# EAGLE board Keyboard_C64_HotSwap_noFrame (EAGLE 9.6.0), part 1 of 2
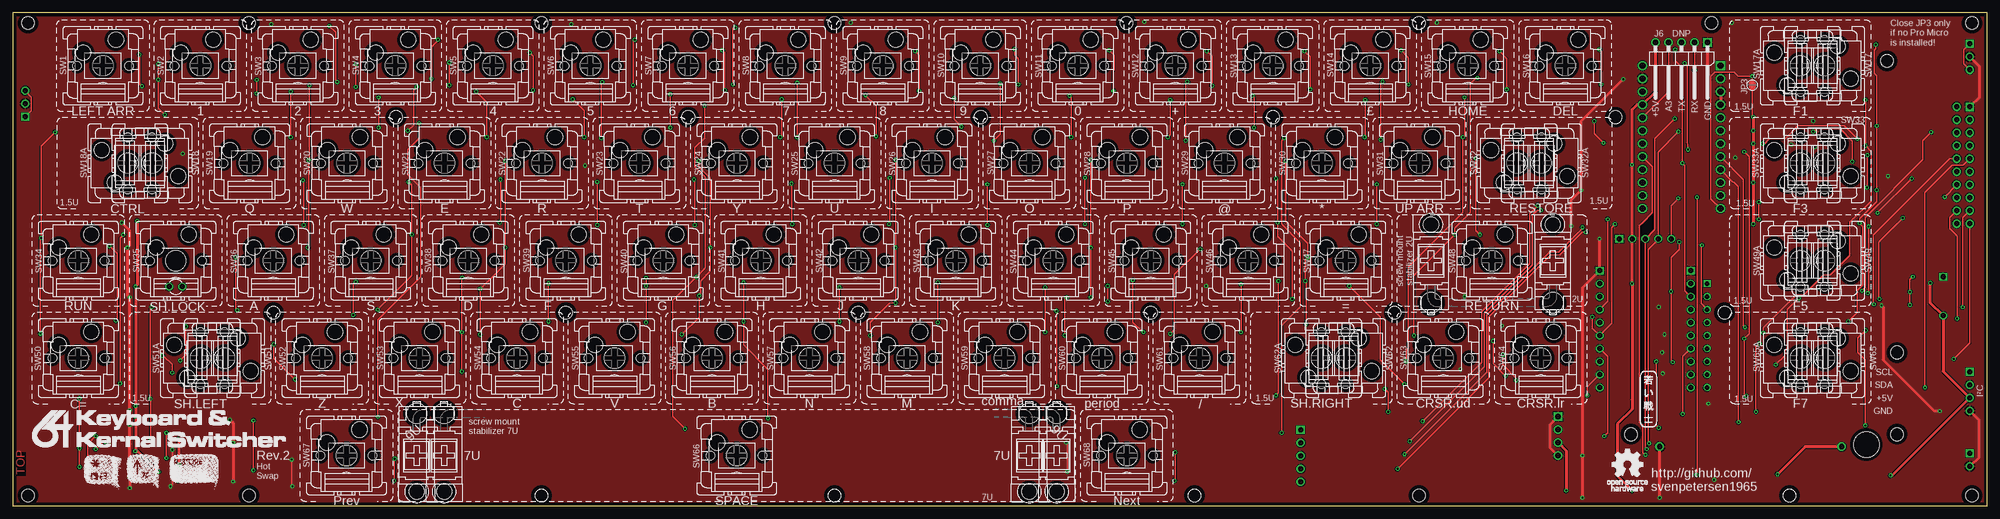
[diagram p0: board, top side]
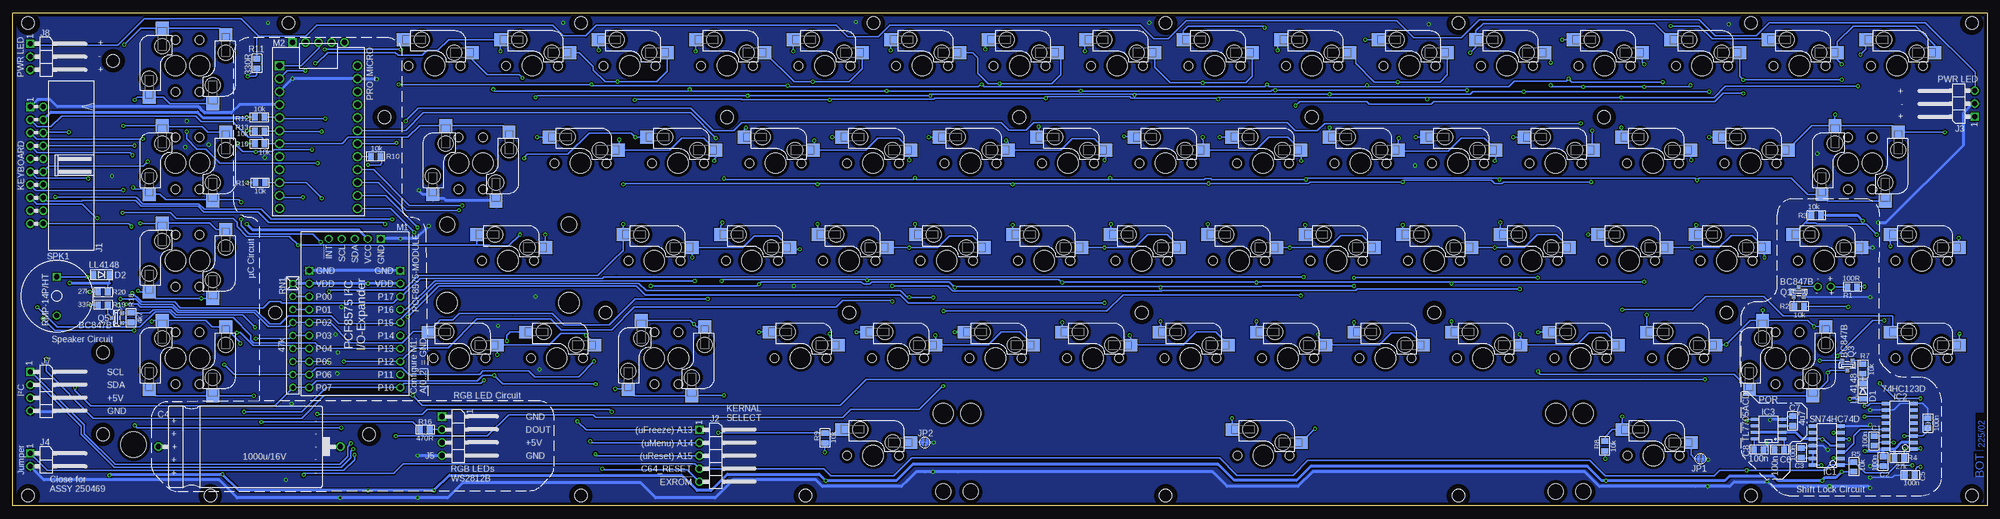
[diagram p1: board, bottom side, seen from below]

Size 385.6 x 96.4 mm. Coordinates in mm from the lower left corner, seen from the top.
Outline: 0,0 385.6,0 385.6,96.4 0,96.4 0,0
Copper layers (1*16): Top 0.035mm / dielectric 1.5mm / Bottom 0.035mm
Design rules "default *": minimum track width 6mil, minimum drill 0.35mm, track to track 6mil, track to pad 6mil, pad to pad 6mil, via to via 6mil, smd to smd 6mil, copper to edge 25mil, drill to drill 6mil, minimum pad ring 10mil, minimum via ring 8mil, stop-mask expansion 4mil, vias tented up to drill 25mil, thermal gap 10mil
Holes 2.5 mm at 3,94.4 3,2 46.16,94.4 103.29,94.4 160.44,94.4 217.52,94.4 274.64,94.4 331.76,94.4 382.6,94.4 46.16,2 103.29,2 160.44,2 274.64,2 347,2 382.6,2 74.8,76 131.92,76 189.04,76 246.14,76 313,76 50.88,37.8 108,37.8 165.12,37.8 222.24,37.8 269.84,37.8 334.34,37.8 230.8,2 366,87 368,30 368,14 316,14
Holes 5 mm at 362,12
tRestrict: area 1,92.4 to 5,96.4; area 44.2,92.4 to 48.2,96.4; area 101.3,92.4 to 105.3,96.4; area 158.4,92.4 to 162.4,96.4; area 215.5,92.4 to 219.5,96.4; area 272.6,92.4 to 276.6,96.4; area 329.8,92.4 to 333.8,96.4; area 380.6,92.4 to 384.6,96.4; area 72.8,74 to 76.8,78; area 129.9,74 to 133.9,78; area 187,74 to 191,78; area 244.1,74 to 248.1,78; 25 more areas
bRestrict: area 1,92.4 to 5,96.4; area 44.2,92.4 to 48.2,96.4; area 101.3,92.4 to 105.3,96.4; area 158.4,92.4 to 162.4,96.4; area 215.5,92.4 to 219.5,96.4; area 272.6,92.4 to 276.6,96.4; area 329.8,92.4 to 333.8,96.4; area 380.6,92.4 to 384.6,96.4; area 72.8,74 to 76.8,78; area 129.9,74 to 133.9,78; area 187,74 to 191,78; area 244.1,74 to 248.1,78; 25 more areas; 3 lines

## Footprints (pad centres in the part's own frame; a part is rotated, then mirrored left to right if it is on the bottom)
0805 = smd 1.092 x 1.397: 1 -0.94,0; 2 0.94,0
C30X16L = drill 1.016 pad 1.651: A -17.78,0; K 17.78,0
SOD80C = smd 1 x 1.6: A -1.5,0; K 1.5,0
SO-14 = smd 0.61 x 1.524: 1 -3.81,-2.794; 2 -2.54,-2.794; 3 -1.27,-2.794; 4 0,-2.794; 5 1.27,-2.794; 6 2.54,-2.794; 7 3.81,-2.794; 8 3.81,2.667; 9 2.54,2.667; 10 1.27,2.667; 11 0,2.667; 12 -1.27,2.667; 13 -2.54,2.667; 14 -3.81,2.667
SO-16 = smd 0.61 x 1.524: 1 -3.81,-2.819; 2 -2.54,-2.819; 3 -1.27,-2.819; 4 0,-2.819; 5 1.27,-2.819; 6 2.54,-2.819; 7 3.81,-2.819; 8 5.08,-2.819; 9 5.08,2.692; 10 3.81,2.692; 11 2.54,2.692; 12 1.27,2.692; 13 0,2.692; 14 -1.27,2.692; 15 -2.54,2.692; 16 -3.81,2.692
SO8 = smd 0.6 x 1.5: 1 -1.905,-2.699; 2 -0.635,-2.699; 3 0.635,-2.699; 4 1.905,-2.699; 5 1.905,2.699; 6 0.635,2.699; 7 -0.635,2.699; 8 -1.905,2.699
2X10WH = drill 1 pad 1.626 square: 1 -11.43,-1.27 | drill 1 pad 1.626: 2 -11.43,1.27; 3 -8.89,-1.27; 4 -8.89,1.27; 5 -6.35,-1.27; 6 -6.35,1.27; 7 -3.81,-1.27; 8 -3.81,1.27; 9 -1.27,-1.27; 10 -1.27,1.27; 11 1.27,-1.27; 12 1.27,1.27; 13 3.81,-1.27; 14 3.81,1.27; 15 6.35,-1.27; 16 6.35,1.27; 17 8.89,-1.27; 18 8.89,1.27; 19 11.43,-1.27; 20 11.43,1.27
1X05/90 = drill 1 pad 1.626 square: 1 -5.08,0 | drill 1 pad 1.626: 2 -2.54,0; 3 0,0; 4 2.54,0; 5 5.08,0
1X03/90 = drill 1 pad 1.626 square: 1 -2.54,0 | drill 1 pad 1.626: 2 0,0; 3 2.54,0
1X02/90 = drill 1 pad 1.626 square: 1 -1.27,0 | drill 1 pad 1.626: 2 1.27,0
1X04/90 = drill 1 pad 1.626 square: 1 -3.81,0 | drill 1 pad 1.626: 2 -1.27,0; 3 1.27,0; 4 3.81,0
CP_CL = smd 0.152 x 0.152: 1 -0.4,0; 2 0.4,0
CP_OP = smd 0.152 x 0.152: 1 -0.4,0; 2 0.4,0
PCF8575MODUL = drill 1 square: A1 -8.89,-8.5; B1 8.89,-8.5; C1 -5.08,-14.7 | drill 1: A2 -8.89,-5.96; A3 -8.89,-3.42; A4 -8.89,-0.88; A5 -8.89,1.66; A6 -8.89,4.2; A7 -8.89,6.74; A8 -8.89,9.28; A9 -8.89,11.82; A10 -8.89,14.36; B2 8.89,-5.96; B3 8.89,-3.42; B4 8.89,-0.88; B5 8.89,1.66; B6 8.89,4.2; B7 8.89,6.74; B8 8.89,9.28; B9 8.89,11.82; B10 8.89,14.36; C2 -2.54,-14.7; C3 0,-14.7; C4 2.54,-14.7; C5 5.08,-14.7
PRO_MICRO = drill 1.2 square: 1 -7.62,13.97 | drill 1.2: 2 -7.62,11.43; 3 -7.62,8.89; 4 -7.62,6.35; 5 -7.62,3.81; 6 -7.62,1.27; 7 -7.62,-1.27; 8 -7.62,-3.81; 9 -7.62,-6.35; 10 -7.62,-8.89; 11 -7.62,-11.43; 12 -7.62,-13.97; 13 7.62,-13.97; 14 7.62,-11.43; 15 7.62,-8.89; 16 7.62,-6.35; 17 7.62,-3.81; 18 7.62,-1.27; 19 7.62,1.27; 20 7.62,3.81; 21 7.62,6.35; 22 7.62,8.89; 23 7.62,11.43; 24 7.62,13.97
SOT23 = smd 0.8 x 0.9: 1 -0.953,-0.953; 2 0.953,-0.953; 3 0,0.953
RN-9 = drill 0.889 pad 1.397 square: 1 -10.16,0 | drill 0.889 pad 1.397: 2 -7.62,0; 3 -5.08,0; 4 -2.54,0; 5 0,0; 6 2.54,0; 7 5.08,0; 8 7.62,0; 9 10.16,0
RMP-14P/HT = drill 1 square: 1 0,3.8 | drill 1: 2 0,-3.8
CHERRYMX_HOTSWAP = smd 2.55 x 2.5 bottom: 1 -7.366,2.54; 2 6.096,5.08 | hole 4: 0,0 | hole 1.7: 5.08,0; -5.08,0 | hole 3: -3.81,2.54; 2.54,5.08
CHERRYMX_HSWP_LD = smd 2.55 x 2.5 bottom: 1 -7.366,2.54; 2 6.096,5.08 | drill 1: LDA -1.27,-5.08; LDC 1.27,-5.08 | hole 4: 0,0 | hole 1.7: 5.08,0; -5.08,0 | hole 3: -3.81,2.54; 2.54,5.08
STABIL_PIN_SCREW_L = hole 3: 0,7.05 | hole 4: 0,-8.24
STABIL_PIN_SCREW = hole 3: 0,7.05 | hole 4: 0,-8.24

## Placement (x,y rotation side)
C1  100n  [0805]  22.07,12.7 90 bottom
C2  100n  [0805]  20.32,8.73 90 bottom
C3  100n  [0805]  36.3,10.4 270 bottom
C4  1000u/16V  [C30X16L]  339.41,11.59 0 bottom
C5  100n  [0805]  15.08,6.03 0 bottom
C6  100n  [0805]  40.6,11 0 bottom
C7  4u7  [0805]  38,16.6 270 bottom
C8  100n  [0805]  44.6,11 0 bottom
C9  100n  [0805]  11.59,16.19 90 bottom
D1  LL4148  [SOD80C]  24.3,22.4 90 bottom
D2  LL4148  [SOD80C]  368.26,45.17 0 bottom
IC1  SN74HC74D  [SO-14]  31.4,11.8 90 bottom
IC2  74HC123D  [SO-16]  17.14,14.92 90 bottom
IC3  TL7705ACD  [SO8]  42.7,15 90 bottom
J1  [2X10WH]  380.93,66.6 270 bottom
J2  [1X05/90]  251.5,9.8 270 bottom
J3  [1X03/90]  2.42,78.62 90 bottom
J4  [1X02/90]  382.2,9 270 bottom
J5  [1X04/90]  301.78,13.65 270 bottom
J6  [1X05/90]  325.9,90.6 180 top
J7  [1X04/90]  382.2,22.4 270 bottom
J8  [1X03/90]  382.2,87.8 270 bottom
JP1  [CP_CL]  55.97,9.23 180 bottom
JP2  [CP_CL]  207.5,12.4 180 bottom
JP3  [CP_OP]  339.74,82.26 270 top
M1  PCF8575-MODULE  [PCF8575MODUL]  318.8,37.5 180 bottom
M2  PRO_MICRO  [PRO_MICRO]  325.9,72.1 0 bottom
Q1  BC847B  [SOT23]  36.79,41.82 0 bottom
Q3  BC847B  [SOT23]  27.34,27.48 180 bottom
Q5  BC847B  [SOT23]  365.26,36.73 90 bottom
R1  100R  [0805]  26.37,42.82 0 bottom
R2  10k  [0805]  36.75,39.02 0 bottom
R3  10k  [0805]  33.43,56.82 0 bottom
R4  27k  [0805]  17.14,9.37 180 bottom
R5  10k  [0805]  26.04,7.62 270 bottom
R7  10k  [0805]  24.3,26.8 90 bottom
R8  10k  [0805]  74.7,11.7 270 bottom
R9  10k  [0805]  226.98,13.26 270 bottom
R10  10k  [0805]  314.7,68.3 180 bottom
R11  330R  [0805]  337.95,86.48 270 bottom
R12  10k  [0805]  337.4,76 180 bottom
R13  10k  [0805]  337.4,73.3 180 bottom
R14  10k  [0805]  337.3,63.2 180 bottom
R15  10k  [0805]  337.4,70.8 180 bottom
R16  470R  [0805]  305.12,14.92 0 bottom
R18  4k7  [0805]  362.53,36.81 90 bottom
R19  33R  [0805]  368,39.3 0 bottom
R20  27k  [0805]  368,41.8 0 bottom
RN1  47k  [RN-9]  330.9,33.3 270 bottom
SPK1  RMP-14P/HT  [RMP-14P/HT]  377,41 0 bottom
SW1  MXHOTSWAP  [CHERRYMX_HOTSWAP]  17.6,86.05 0 top
SW2  MXHOTSWAP  [CHERRYMX_HOTSWAP]  36.64,86.05 0 top
SW3  MXHOTSWAP  [CHERRYMX_HOTSWAP]  55.68,86.05 0 top
SW4  MXHOTSWAP  [CHERRYMX_HOTSWAP]  74.72,86.05 0 top
SW5  MXHOTSWAP  [CHERRYMX_HOTSWAP]  93.76,86.05 0 top
SW6  MXHOTSWAP  [CHERRYMX_HOTSWAP]  112.8,86.05 0 top
SW7  MXHOTSWAP  [CHERRYMX_HOTSWAP]  131.84,86.05 0 top
SW8  MXHOTSWAP  [CHERRYMX_HOTSWAP]  150.88,86.05 0 top
SW9  MXHOTSWAP  [CHERRYMX_HOTSWAP]  169.92,86.05 0 top
SW10  MXHOTSWAP  [CHERRYMX_HOTSWAP]  188.96,86.05 0 top
SW11  MXHOTSWAP  [CHERRYMX_HOTSWAP]  208,86.05 0 top
SW12  MXHOTSWAP  [CHERRYMX_HOTSWAP]  227.04,86.05 0 top
SW13  MXHOTSWAP  [CHERRYMX_HOTSWAP]  246.08,86.05 0 top
SW14  MXHOTSWAP  [CHERRYMX_HOTSWAP]  265.12,86.05 0 top
SW15  MXHOTSWAP  [CHERRYMX_HOTSWAP]  284.16,86.05 0 top
SW16  MXHOTSWAP  [CHERRYMX_HOTSWAP]  303.2,86.05 0 top
SW17  MXHOTSWAP  [CHERRYMX_HOTSWAP]  353.85,86.05 270 top
SW17A  MXHOTSWAP  [CHERRYMX_HOTSWAP]  349.1,86.05 90 top
SW18  MXHOTSWAP  [CHERRYMX_HOTSWAP]  27.2,67 270 top
SW18A  MXHOTSWAP  [CHERRYMX_HOTSWAP]  22.45,67 90 top
SW19  MXHOTSWAP  [CHERRYMX_HOTSWAP]  46.24,67 0 top
SW20  MXHOTSWAP  [CHERRYMX_HOTSWAP]  65.28,67 0 top
SW21  MXHOTSWAP  [CHERRYMX_HOTSWAP]  84.32,67 0 top
SW22  MXHOTSWAP  [CHERRYMX_HOTSWAP]  103.36,67 0 top
SW23  MXHOTSWAP  [CHERRYMX_HOTSWAP]  122.4,67 0 top
SW24  MXHOTSWAP  [CHERRYMX_HOTSWAP]  141.44,67 0 top
SW25  MXHOTSWAP  [CHERRYMX_HOTSWAP]  160.48,67 0 top
SW26  MXHOTSWAP  [CHERRYMX_HOTSWAP]  179.52,67 0 top
SW27  MXHOTSWAP  [CHERRYMX_HOTSWAP]  198.56,67 0 top
SW28  MXHOTSWAP  [CHERRYMX_HOTSWAP]  217.6,67 0 top
SW29  MXHOTSWAP  [CHERRYMX_HOTSWAP]  236.64,67 0 top
SW30  MXHOTSWAP  [CHERRYMX_HOTSWAP]  255.68,67 0 top
SW31  MXHOTSWAP  [CHERRYMX_HOTSWAP]  274.72,67 0 top
SW32  MXHOTSWAP  [CHERRYMX_HOTSWAP]  293.76,67 90 top
SW32A  MXHOTSWAP  [CHERRYMX_HOTSWAP]  298.51,67 270 top
SW33  MXHOTSWAP  [CHERRYMX_HOTSWAP]  353.85,67 270 top
SW33A  MXHOTSWAP  [CHERRYMX_HOTSWAP]  349.1,67 90 top
SW34  MXHOTSWAP  [CHERRYMX_HOTSWAP]  12.8,47.95 0 top
SW35  MX+LEDHSWP  [CHERRYMX_HSWP_LD]  31.84,47.95 0 top
SW36  MXHOTSWAP  [CHERRYMX_HOTSWAP]  50.88,47.95 0 top
SW37  MXHOTSWAP  [CHERRYMX_HOTSWAP]  69.92,47.95 0 top
SW38  MXHOTSWAP  [CHERRYMX_HOTSWAP]  88.96,47.95 0 top
SW39  MXHOTSWAP  [CHERRYMX_HOTSWAP]  108,47.95 0 top
SW40  MXHOTSWAP  [CHERRYMX_HOTSWAP]  127.04,47.95 0 top
SW41  MXHOTSWAP  [CHERRYMX_HOTSWAP]  146.08,47.95 0 top
SW42  MXHOTSWAP  [CHERRYMX_HOTSWAP]  165.12,47.95 0 top
SW43  MXHOTSWAP  [CHERRYMX_HOTSWAP]  184.16,47.95 0 top
SW44  MXHOTSWAP  [CHERRYMX_HOTSWAP]  203.2,47.95 0 top
SW45  MXHOTSWAP  [CHERRYMX_HOTSWAP]  222.24,47.95 0 top
SW46  MXHOTSWAP  [CHERRYMX_HOTSWAP]  241.28,47.95 0 top
SW47  MXHOTSWAP  [CHERRYMX_HOTSWAP]  260.32,47.95 0 top
SW48  MXHOTSWAP  [CHERRYMX_HOTSWAP]  288.88,47.95 0 top
SW49  MXHOTSWAP  [CHERRYMX_HOTSWAP]  353.85,47.95 270 top
SW49A  MXHOTSWAP  [CHERRYMX_HOTSWAP]  349.1,47.95 90 top
SW50  MXHOTSWAP  [CHERRYMX_HOTSWAP]  12.8,28.9 0 top
SW51  MXHOTSWAP  [CHERRYMX_HOTSWAP]  41.36,28.9 270 top
SW51A  MXHOTSWAP  [CHERRYMX_HOTSWAP]  36.61,28.9 90 top
SW52  MXHOTSWAP  [CHERRYMX_HOTSWAP]  60.4,28.9 0 top
SW53  MXHOTSWAP  [CHERRYMX_HOTSWAP]  79.44,28.9 0 top
SW54  MXHOTSWAP  [CHERRYMX_HOTSWAP]  98.48,28.9 0 top
SW55  MXHOTSWAP  [CHERRYMX_HOTSWAP]  117.52,28.9 0 top
SW56  MXHOTSWAP  [CHERRYMX_HOTSWAP]  136.56,28.9 0 top
SW57  MXHOTSWAP  [CHERRYMX_HOTSWAP]  155.6,28.9 0 top
SW58  MXHOTSWAP  [CHERRYMX_HOTSWAP]  174.64,28.9 0 top
SW59  MXHOTSWAP  [CHERRYMX_HOTSWAP]  193.68,28.9 0 top
SW60  MXHOTSWAP  [CHERRYMX_HOTSWAP]  212.72,28.9 0 top
SW61  MXHOTSWAP  [CHERRYMX_HOTSWAP]  231.76,28.9 0 top
SW62  MXHOTSWAP  [CHERRYMX_HOTSWAP]  260.32,28.9 270 top
SW62A  MXHOTSWAP  [CHERRYMX_HOTSWAP]  255.57,28.9 90 top
SW63  MXHOTSWAP  [CHERRYMX_HOTSWAP]  279.36,28.9 0 top
SW64  MXHOTSWAP  [CHERRYMX_HOTSWAP]  298.4,28.9 0 top
SW65  MXHOTSWAP  [CHERRYMX_HOTSWAP]  353.85,28.9 270 top
SW65A  MXHOTSWAP  [CHERRYMX_HOTSWAP]  349.1,28.9 90 top
SW66  MXHOTSWAP  [CHERRYMX_HOTSWAP]  141.38,9.85 0 top
SW67  MXHOTSWAP  [CHERRYMX_HOTSWAP]  65.18,9.85 0 top
SW68  MXHOTSWAP  [CHERRYMX_HOTSWAP]  217.58,9.85 0 top
U$90  OPEN_SOURCE_HW  [OPENHW]  311.4,2.88 0 top
U$92  [KCAP_1_5U]  349.1,86.05 0 top
U$93  [KCAP_1_5U]  349.1,67 0 top
U$94  [KCAP_1_5U]  349.1,47.95 0 top
U$95  [KCAP_1_5U]  349.1,28.9 0 top
U$96  [KCAP_1_5U]  255.57,28.9 0 top
U$97  [KCAP_1_5U]  22.45,67 0 top
U$98  [KCAP_1_5U]  36.61,28.9 0 top
U$99  [KCAP_1U]  65.18,9.85 0 top
U$100  [KCAP_1U]  217.58,9.85 0 top
U$101  [KCAP_1U]  17.6,86.05 0 top
U$102  [KCAP_1U]  303.2,86.05 0 top
U$103  [KCAP_1U]  298.4,28.9 0 top
U$104  [KCAP_7U]  141.38,9.85 0 top
U$105  [KCAP_2U]  288.88,47.95 0 top
U$106  [KCAP_1_5U]  298.51,67 0 top
U$107  [KCAP_1U]  12.8,47.95 0 top
U$108  [KCAP_1U]  12.8,28.9 0 top
U$109  [KCAP_1U]  36.64,86.05 0 top
U$110  [KCAP_1U]  55.68,86.05 0 top
U$111  [KCAP_1U]  74.72,86.05 0 top
U$112  [KCAP_1U]  93.76,86.05 0 top
U$113  [KCAP_1U]  112.8,86.05 0 top
U$114  [KCAP_1U]  131.84,86.05 0 top
U$115  [KCAP_1U]  150.88,86.05 0 top
U$116  [KCAP_1U]  169.92,86.05 0 top
U$117  [KCAP_1U]  188.96,86.05 0 top
U$118  [KCAP_1U]  208,86.05 0 top
U$119  [KCAP_1U]  227.04,86.05 0 top
U$120  [KCAP_1U]  246.08,86.05 0 top
U$121  [KCAP_1U]  265.12,86.05 0 top
U$122  [KCAP_1U]  284.16,86.05 0 top
U$123  [KCAP_1U]  46.24,67 0 top
U$124  [KCAP_1U]  65.28,67 0 top
U$125  [KCAP_1U]  84.32,67 0 top
U$126  [KCAP_1U]  103.36,67 0 top
U$127  [KCAP_1U]  122.4,67 0 top
U$128  [KCAP_1U]  141.44,67 0 top
U$129  [KCAP_1U]  160.48,67 0 top
U$130  [KCAP_1U]  179.52,67 0 top
U$131  [KCAP_1U]  198.56,67 0 top
U$132  [KCAP_1U]  217.6,67 0 top
U$133  [KCAP_1U]  236.64,67 0 top
U$134  [KCAP_1U]  255.68,67 0 top
U$135  [KCAP_1U]  274.72,67 0 top
U$136  [KCAP_1U]  50.88,47.95 0 top
U$137  [KCAP_1U]  69.92,47.95 0 top
U$138  [KCAP_1U]  88.96,47.95 0 top
U$139  [KCAP_1U]  108,47.95 0 top
U$140  [KCAP_1U]  127.04,47.95 0 top
U$141  [KCAP_1U]  146.08,47.95 0 top
U$142  [KCAP_1U]  165.12,47.95 0 top
U$143  [KCAP_1U]  184.16,47.95 0 top
U$144  [KCAP_1U]  203.2,47.95 0 top
U$145  [KCAP_1U]  222.24,47.95 0 top
U$146  [KCAP_1U]  241.28,47.95 0 top
U$147  [KCAP_1U]  260.32,47.95 0 top
U$148  [KCAP_1U]  31.84,47.95 0 top
U$149  [KCAP_1U]  60.4,28.9 0 top
U$150  [KCAP_1U]  79.44,28.9 0 top
U$151  [KCAP_1U]  98.48,28.9 0 top
U$152  [KCAP_1U]  117.52,28.9 0 top
U$153  [KCAP_1U]  136.56,28.9 0 top
U$154  [KCAP_1U]  155.6,28.9 0 top
U$155  [KCAP_1U]  174.64,28.9 0 top
U$156  [KCAP_1U]  193.68,28.9 0 top
U$157  [KCAP_1U]  212.72,28.9 0 top
U$158  [KCAP_1U]  231.76,28.9 0 top
U$159  [KCAP_1U]  279.36,28.9 0 top
U$161  [2LAYER]  2.32,6.05 90 top
U$164  [C64_KEYS]  13.83,2.65 0 top
U$172  [STABIL_PIN_SCREW_L]  276.98,47.95 0 top
U$173  [STABIL_PIN_SCREW]  300.78,47.94 0 top
U$174  [STABIL_PIN_SCREW]  84.23,9.85 180 top
U$175  [STABIL_PIN_SCREW_L]  198.53,9.85 180 top
U$176  [64KB]  3.8,11.5 0 top
U$178  [SVEN_TAG]  319.5,21 0 top
U$180  [STABIL_PIN_SCREW]  78.88,9.85 180 top
U$181  [STABIL_PIN_SCREW_L]  203.88,9.85 180 top

## Library data of the parts
C1-C3 C5 R1-R5 R7-R10 R12-R16 R18-R20 = SMD
C4 = ELCO
C6-C9 R11 RN1 = DISCRETE
D1 D2 = Dioden
IC1 IC2 = 74XXsmd
IC3 = Texas_Instruments
J1-J8 = PINHEAD
JP1-JP3 = Cutpad
M1 M2 = Arduino
Q1 Q3 Q5 = Transistoren
SPK1 = KM
SW1 = CherryMX; KEY: LEFT ARR
SW2 = CherryMX; KEY: 1
SW3 = CherryMX; KEY: 2
SW4 = CherryMX; KEY: 3
SW5 = CherryMX; KEY: 4
SW6 = CherryMX; KEY: 5
SW7 = CherryMX; KEY: 6
SW8 = CherryMX; KEY: 7
SW9 = CherryMX; KEY: 8
SW10 = CherryMX; KEY: 9
SW11 = CherryMX; KEY: 0
SW12 = CherryMX; KEY: +
SW13 = CherryMX; KEY: -
SW14 = CherryMX; KEY: £
SW15 = CherryMX; KEY: HOME
SW16 = CherryMX; KEY: DEL
SW17 SW17A = CherryMX; KEY: F1
SW18 SW18A = CherryMX; KEY: CTRL
SW19 = CherryMX; KEY: Q
SW20 = CherryMX; KEY: W
SW21 = CherryMX; KEY: E
SW22 = CherryMX; KEY: R
SW23 = CherryMX; KEY: T
SW24 = CherryMX; KEY: Y
SW25 = CherryMX; KEY: U
SW26 = CherryMX; KEY: I
SW27 = CherryMX; KEY: O
SW28 = CherryMX; KEY: P
SW29 = CherryMX; KEY: @
SW30 = CherryMX; KEY: *
SW31 = CherryMX; KEY: UP ARR
SW32 SW32A = CherryMX; KEY: RESTORE
SW33 SW33A = CherryMX; KEY: F3
SW34 = CherryMX; KEY: RUN
SW35 = CherryMX; KEY: SH.LOCK
SW36 = CherryMX; KEY: A
SW37 = CherryMX; KEY: S
SW38 = CherryMX; KEY: D
SW39 = CherryMX; KEY: F
SW40 = CherryMX; KEY: G
SW41 = CherryMX; KEY: H
SW42 = CherryMX; KEY: J
SW43 = CherryMX; KEY: K
SW44 = CherryMX; KEY: L
SW45 = CherryMX; KEY: [
SW46 = CherryMX; KEY: ]
SW47 = CherryMX; KEY: =
SW48 = CherryMX; KEY: RETURN
SW49 SW49A = CherryMX; KEY: F5
SW50 = CherryMX; KEY: C=
SW51 SW51A = CherryMX; KEY: SH.LEFT
SW52 = CherryMX; KEY: Z
SW53 = CherryMX; KEY: X
SW54 = CherryMX; KEY: C
SW55 = CherryMX; KEY: V
SW56 = CherryMX; KEY: B
SW57 = CherryMX; KEY: N
SW58 = CherryMX; KEY: M
SW59 = CherryMX; KEY: comma
SW60 = CherryMX; KEY: period
SW61 = CherryMX; KEY: /
SW62 SW62A = CherryMX; KEY: SH.RIGHT
SW63 = CherryMX; KEY: CRSR.ud
SW64 = CherryMX; KEY: CRSR.lr
SW65 SW65A = CherryMX; KEY: F7
SW66 = CherryMX; KEY: SPACE
SW67 = CherryMX; KEY: Prev
SW68 = CherryMX; KEY: Next
U$90 U$164 U$176 U$178 = Logo
U$92-U$159 U$172-U$175 U$180 U$181 = CherryMX
U$161 = I-TEILE

## Nets
!C64RES: C9.1 IC1.1 IC2.3 IC3.5 J2.4 M2.11 R5.1
!EXROM: J2.5 M2.13
!INT6: M1.C5 M2.10 R14.1
!LOCK: C5.2 IC2.1 R3.1 SW35.2
!P1: M2.18 R8.1 SW67.2
!P2: M2.19 R9.1 SW68.2
!RESTORE: J1.3 M2.7 R15.1 SW32.2 SW32A.1
!SHORT_BRD: J4.1 M2.17 R10.2
+5V: C2.2 C3.2 C4.A D2.K IC1.4 IC1.10 IC1.12 IC1.13 IC1.14 IC2.2 IC2.9 IC2.11 IC2.16 IC3.2 IC3.7 J1.4 J5.3 J6.5 J7.3 JP3.2 M1.A2 M1.B2 M1.C2 M2.21 R1.2 R3.2 R4.2 R5.2 R8.2 R9.2 R10.1 R12.2 R13.2 R14.2 R15.2 R20.2 RN1.1 SPK1.2
A3: J6.4 M2.20
COL0: J1.13 M1.A10 SW16.1 SW17.1 SW17A.2 SW33.1 SW33A.2 SW48.1 SW49.1 SW49A.2 SW63.1 SW64.1 SW65.1 SW65A.2
COL1: J1.19 M1.A9 Q3.2 SW4.1 SW5.1 SW20.1 SW21.1 SW36.1 SW37.1 SW51.1 SW51A.2 SW52.1
COL2: J1.18 M1.A8 SW6.1 SW7.1 SW22.1 SW23.1 SW38.1 SW39.1 SW53.1 SW54.1
COL3: J1.17 M1.A7 SW8.1 SW9.1 SW24.1 SW25.1 SW40.1 SW41.1 SW55.1 SW56.1
COL4: J1.16 M1.A6 SW10.1 SW11.1 SW26.1 SW27.1 SW42.1 SW43.1 SW57.1 SW58.1
COL5: J1.15 M1.A5 SW12.1 SW13.1 SW28.1 SW29.1 SW44.1 SW45.1 SW59.1 SW60.1
COL6: J1.14 M1.A4 SW14.1 SW15.1 SW30.1 SW31.1 SW46.1 SW47.1 SW61.1 SW62.1 SW62A.2
COL7: J1.20 M1.A3 SW1.1 SW2.1 SW3.1 SW18.1 SW18A.2 SW19.1 SW34.1 SW50.1 SW66.1
GND: C2.1 C3.1 C4.K C5.1 C6.1 C7.1 C8.2 C9.2 IC1.7 IC1.11 IC2.8 IC2.10 IC3.4 J1.1 J3.2 J4.2 J5.1 J5.4 J6.1 J7.4 J8.2 JP1.1 JP2.1 M1.A1 M1.B1 M1.C1 M2.3 M2.4 M2.23 Q1.2 Q5.2 SW32.1 SW32A.2 SW35.1
KSW_A13: J2.1 M2.16
KSW_A14: J2.2 M2.15
KSW_A15: J2.3 M2.14
LOCK: IC1.3 IC2.13
N$1: R1.1 SW35.LDA
N$2: Q1.3 SW35.LDC
N$3: Q1.1 R2.1
N$4: C1.2 IC2.14
N$5: IC1.2 IC1.6
N$7: D1.K R7.1
N$8: Q3.1 R7.2
N$9: Q5.1 R18.1
N$10: J3.1 J3.3 J8.1 J8.3 R11.1
N$11: Q5.3 R19.2
N$12: D2.A R19.1 R20.1 SPK1.1
N$13: J5.2 R16.2
N$14: JP1.2 SW67.1
N$15: JP2.2 SW68.1
N$16: C1.1 IC2.15 R4.1
N$17: C8.1 IC3.8
N$18: C6.2 IC3.1
N$19: C7.2 IC3.3
PWRLED: JP3.1 M2.12 R11.2
RAW: M2.24
RGBOUT: M2.9 R16.1
ROW0: J1.12 M1.B3 RN1.2 SW2.2 SW4.2 SW6.2 SW8.2 SW10.2 SW12.2 SW14.2 SW16.2
ROW1: J1.11 M1.B4 RN1.3 SW1.2 SW20.2 SW22.2 SW24.2 SW26.2 SW28.2 SW30.2 SW48.2
ROW2: J1.10 M1.B5 RN1.4 SW18.2 SW18A.1 SW36.2 SW38.2 SW40.2 SW42.2 SW44.2 SW46.2 SW64.2
ROW3: J1.5 M1.B6 RN1.5 SW3.2 SW5.2 SW7.2 SW9.2 SW11.2 SW13.2 SW15.2 SW65.2 SW65A.1
ROW4: J1.8 M1.B7 RN1.6 SW17.2 SW17A.1 SW52.2 SW54.2 SW56.2 SW58.2 SW60.2 SW62.2 SW62A.1 SW66.2
ROW5: J1.7 M1.B8 RN1.7 SW33.2 SW33A.1 SW37.2 SW39.2 SW41.2 SW43.2 SW45.2 SW47.2 SW50.2
ROW6: J1.6 M1.B9 RN1.8 SW19.2 SW21.2 SW23.2 SW25.2 SW27.2 SW29.2 SW31.2 SW49.2 SW49A.1
ROW7: J1.9 M1.B10 Q3.3 RN1.9 SW34.2 SW51.2 SW51A.1 SW53.2 SW55.2 SW57.2 SW59.2 SW61.2 SW63.2
RX: J6.2 M2.2
SCL: J7.1 M1.C4 M2.6 R13.1
SDA: J7.2 M1.C3 M2.5 R12.1
SHIFTLOCK: D1.A IC1.5 R2.2
SND_OUT: M2.8 R18.2
TX: J6.3 M2.1